# Altium PCB Power.PcbDoc
Units mm, origin at the board's own origin, x right, y up, seen from the top; angles counter-clockwise.
Board outline 73.81 x 101.75 mm, 2 copper layers (Top Layer, Bottom Layer), stack 1.448 mm thick; 31 components, 35 nets, 115 pads, 27 vias.
Unrouted connection lines stored in the file: 13.
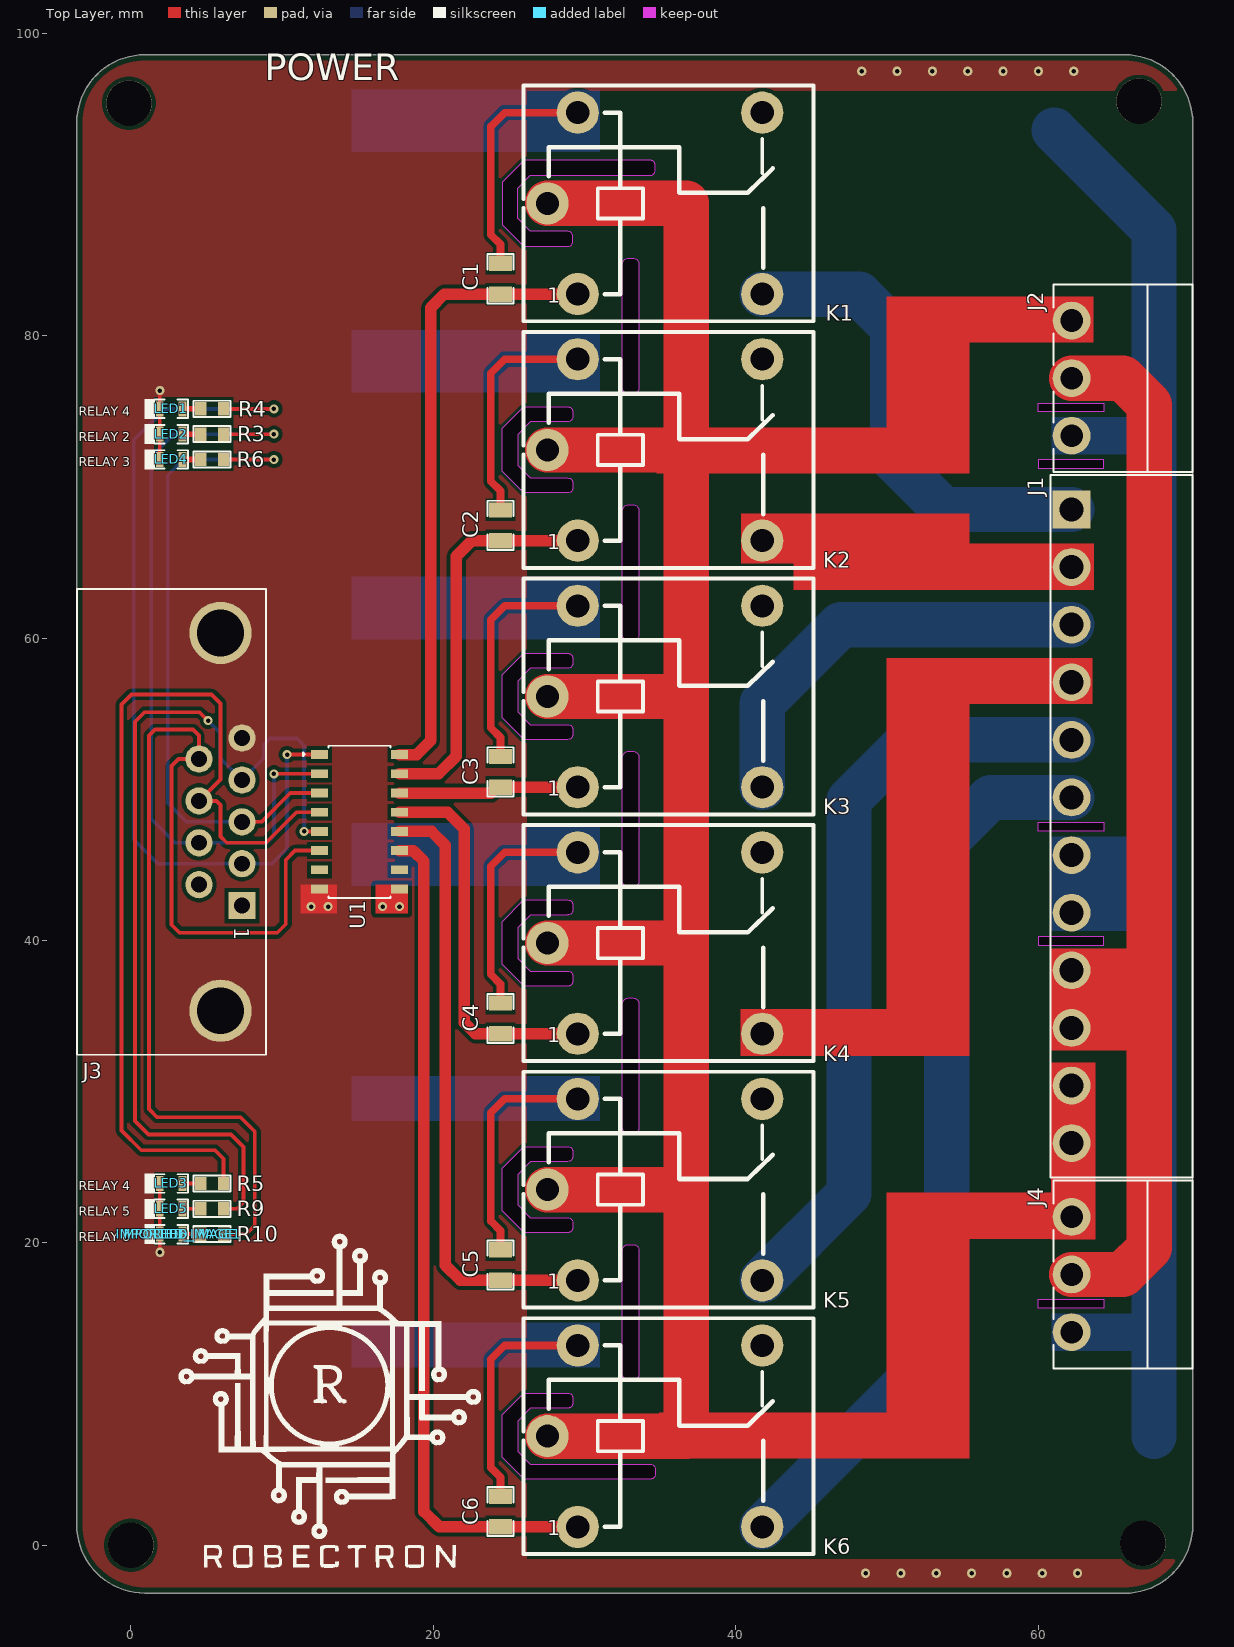
[diagram p0: Top Layer view]
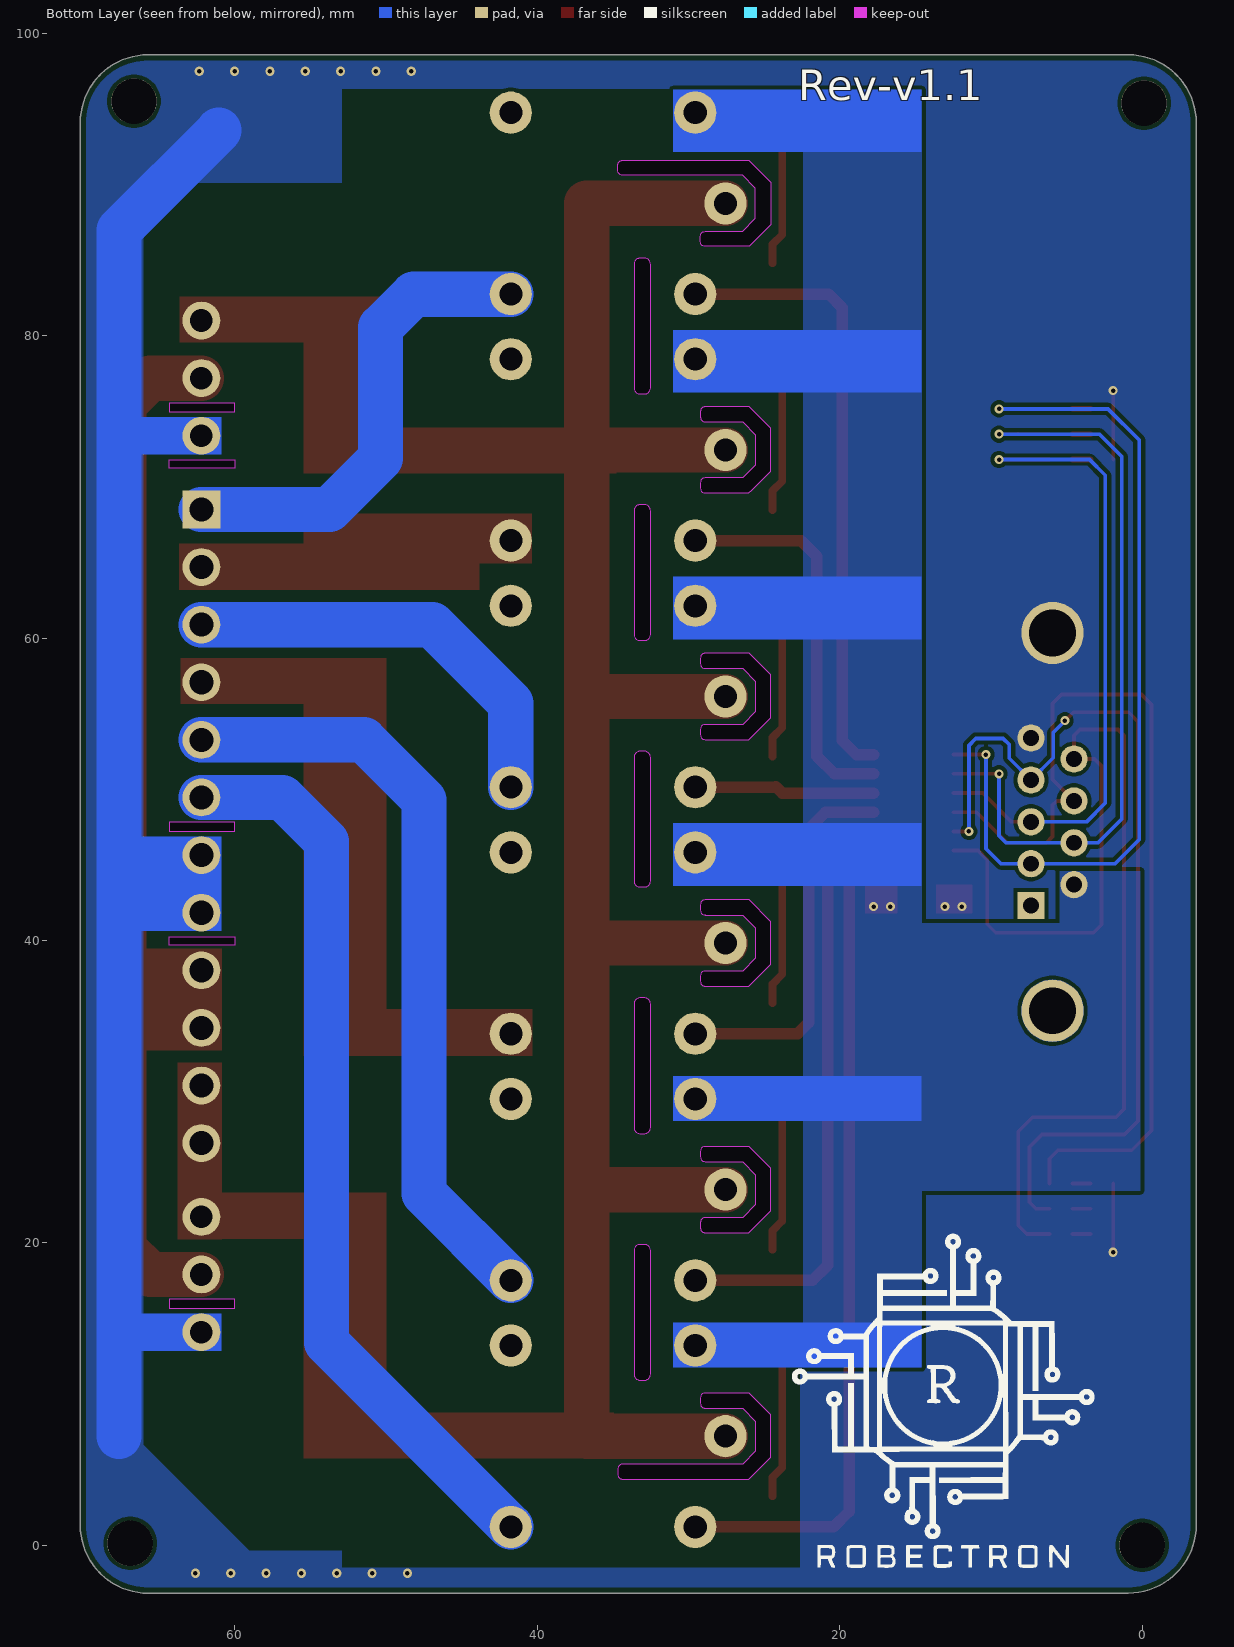
[diagram p1: Bottom Layer view, seen from below]
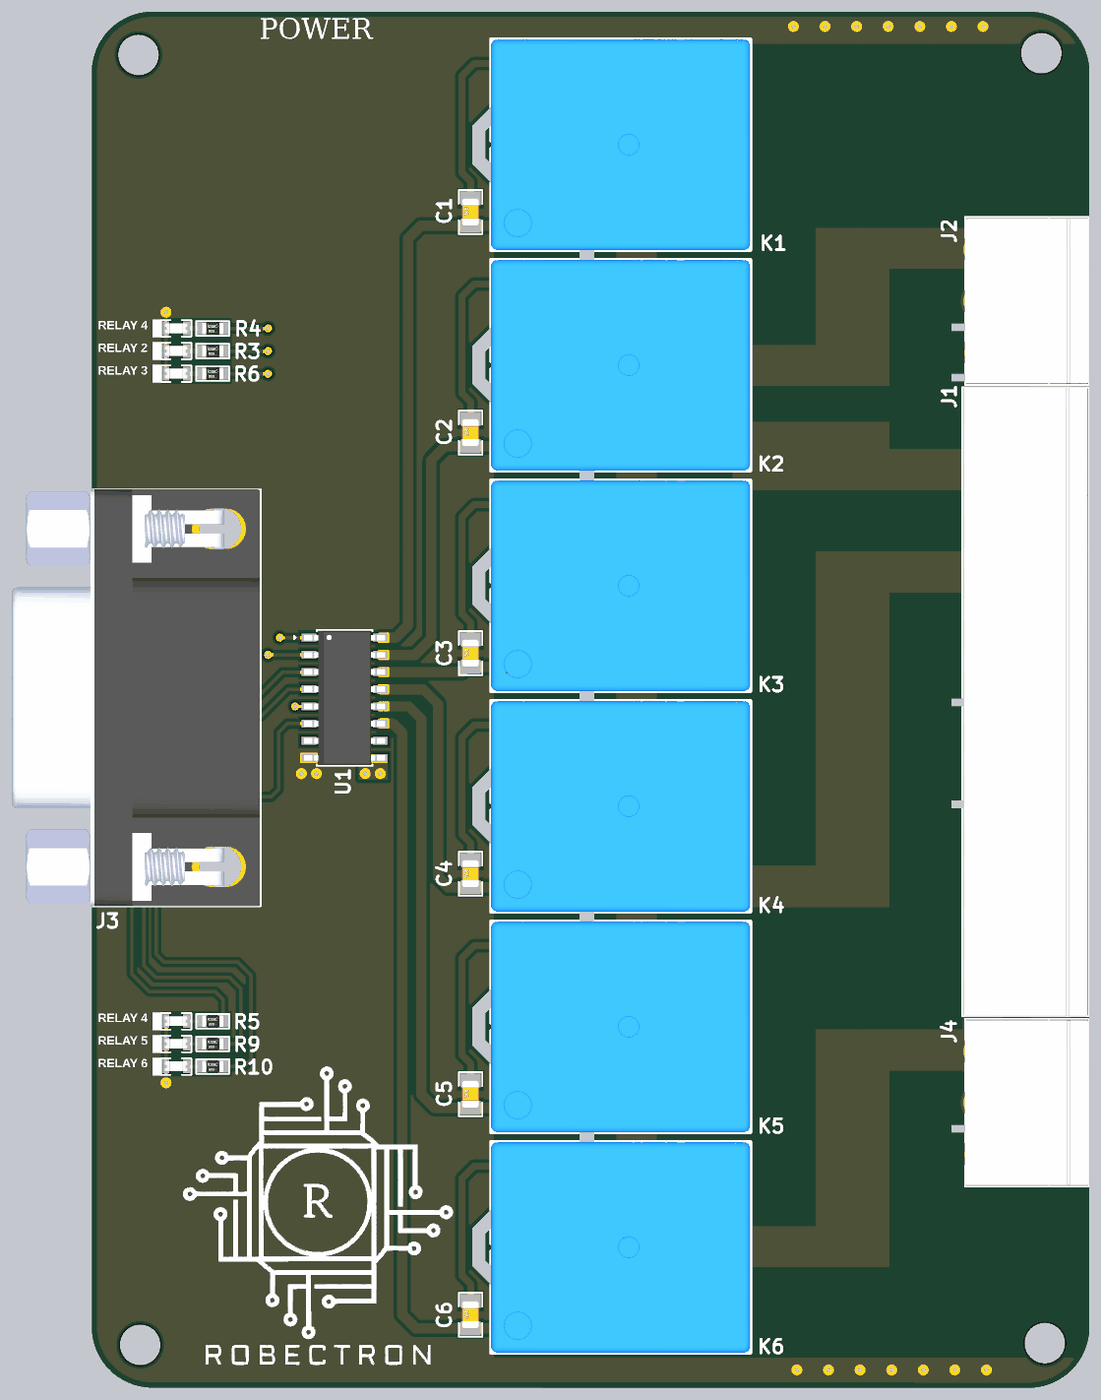
[diagram p2: 3D render of the assembled board from above, using the file's embedded part models]

## Layer stack, top to bottom
Top Solder: solder mask 0.0762, Solder Resist, Dk 3.5
Top Layer: signal copper 0.254
Dielectric 1: core 0.9398, FR-4, Dk 4.8
Bottom Layer: signal copper 0.254
Bottom Solder: solder mask 0.0762, Solder Resist, Dk 3.5

## Board outline
-3.581,1.34 -3.581,94.077 cw(c0.919,94.077) 0.919,98.577 65.731,98.577 cw(c65.731,94.077) 70.231,94.077 70.231,1.325 cw(c65.731,1.325) 65.731,-3.174 0.919,-3.16 cw(c0.919,1.34)
cut-out: 26.01,91.592 25.832,91.415 24.562,90.145 24.562,87.325 25.989,85.898 28.905,85.898 ccw(c28.905,86.203) 29.21,86.203 29.21,86.584 ccw(c28.905,86.584) 28.905,86.889 28.905,86.893 26.427,86.893 25.571,87.749 25.571,89.746 26.427,90.602 34.366,90.602 ccw(c34.366,90.907) 34.671,90.907 34.671,91.288 ccw(c34.366,91.288) 34.366,91.592
cut-out: 26.01,4.369 25.832,4.547 24.562,5.817 24.562,8.636 25.989,10.063 28.905,10.063 cw(c28.905,9.758) 29.21,9.758 29.21,9.377 cw(c28.905,9.377) 28.905,9.072 28.905,9.068 26.427,9.068 25.571,8.212 25.571,6.215 26.427,5.359 34.366,5.359 cw(c34.366,5.055) 34.671,5.055 34.671,4.674 cw(c34.366,4.674) 34.366,4.369
cut-out: 26.01,20.676 25.832,20.853 24.562,22.123 24.562,24.943 25.989,26.37 28.905,26.37 cw(c28.905,26.065) 29.21,26.065 29.21,25.684 cw(c28.905,25.684) 28.905,25.379 28.905,25.375 26.427,25.375 25.571,24.519 25.571,22.522 26.427,21.666 28.905,21.666 cw(c28.905,21.361) 29.21,21.361 29.21,20.98 cw(c28.905,20.98) 28.905,20.676
cut-out: 26.01,36.982 25.832,37.16 24.562,38.43 24.562,41.25 25.989,42.677 28.905,42.677 cw(c28.905,42.372) 29.21,42.372 29.21,41.991 cw(c28.905,41.991) 28.905,41.686 28.905,41.681 26.427,41.681 25.571,40.826 25.571,38.829 26.427,37.973 28.905,37.973 cw(c28.905,37.668) 29.21,37.668 29.21,37.287 cw(c28.905,37.287) 28.905,36.982
cut-out: 26.01,53.289 25.832,53.467 24.562,54.737 24.562,57.556 25.989,58.983 28.905,58.983 cw(c28.905,58.679) 29.21,58.679 29.21,58.298 cw(c28.905,58.298) 28.905,57.993 28.905,57.988 26.427,57.988 25.571,57.133 25.571,55.135 26.427,54.28 28.905,54.28 cw(c28.905,53.975) 29.21,53.975 29.21,53.594 cw(c28.905,53.594) 28.905,53.289
cut-out: 26.01,69.596 25.832,69.774 24.562,71.044 24.562,73.863 25.989,75.29 28.905,75.29 cw(c28.905,74.985) 29.21,74.985 29.21,74.604 cw(c28.905,74.604) 28.905,74.3 28.905,74.295 26.427,74.295 25.571,73.439 25.571,71.442 26.427,70.587 28.905,70.587 cw(c28.905,70.282) 29.21,70.282 29.21,69.901 cw(c28.905,69.901) 28.905,69.596
cut-out: 32.512,11.303 32.512,19.507 cw(c32.893,19.507) 32.893,19.888 33.223,19.888 cw(c33.223,19.507) 33.604,19.507 33.604,11.303 cw(c33.223,11.303) 33.223,10.922 32.893,10.922 cw(c32.893,11.303)
cut-out: 32.512,27.61 32.512,35.814 cw(c32.893,35.814) 32.893,36.195 33.223,36.195 cw(c33.223,35.814) 33.604,35.814 33.604,27.61 cw(c33.223,27.61) 33.223,27.229 32.893,27.229 cw(c32.893,27.61)
cut-out: 32.512,43.917 32.512,52.121 cw(c32.893,52.121) 32.893,52.502 33.223,52.502 cw(c33.223,52.121) 33.604,52.121 33.604,43.917 cw(c33.223,43.917) 33.223,43.536 32.893,43.536 cw(c32.893,43.917)
cut-out: 32.512,60.223 32.512,68.428 cw(c32.893,68.428) 32.893,68.809 33.223,68.809 cw(c33.223,68.428) 33.604,68.428 33.604,60.223 cw(c33.223,60.223) 33.223,59.842 32.893,59.842 cw(c32.893,60.223)
cut-out: 32.512,76.53 32.512,84.734 cw(c32.893,84.734) 32.893,85.115 33.223,85.115 cw(c33.223,84.734) 33.604,84.734 33.604,76.53 cw(c33.223,76.53) 33.223,76.149 32.893,76.149 cw(c32.893,76.53)
cut-out: 60.021,16.258 64.339,16.258 64.339,15.674 60.021,15.674
cut-out: 60.021,71.22 64.339,71.22 64.339,71.804 60.021,71.804
cut-out: 60.021,75.541 64.339,75.541 64.339,74.957 60.021,74.957
cut-out: 60.02,47.806 64.338,47.806 64.338,47.222 60.02,47.222
cut-out: 60.02,39.675 64.338,39.675 64.338,40.259 60.02,40.259

## Design rules (kind name [scope] priority, off if disabled: settings)
BoardOutlineClearance [All] p1: gap=0 ignorepadtopadclearanceinfootprint=FALSE except(0.381: Poly-OutlineEdge)
Clearance [All] p1: gap=0.254 ignorepadtopadclearanceinfootprint=FALSE except(0: Arc-Hole Track-Hole SMDPad-Hole THPad-Hole Via-Hole Fill-Hole Poly-Hole Region-Hole Text-Hole; 0.127: Track-Region Fill-Region)
HoleSize [All] p1: absolutevalues=TRUE maxlimit=3.2 minlimit=0.025 maxpercent=80.000 minpercent=20.000
MinimumSolderMaskSliver [All] p1: minsoldermaskwidth=0
PolygonConnect [All] p1: connectstyle=Direct reliefconductorwidth=0.381 reliefentries=4 polygonreliefangle="45 Angle" airgapwidth=0.254
RoutingVias [All] p1: holewidth=0.3 width=0.6 viastyle="Through Hole" minholewidth=0.3 minwidth=0.6 maxholewidth=0.3 maxwidth=0.6
SilkToSilkClearance [All] p1: silktosilkclearance=0
SilkToSolderMaskClearance [IsPad] p1: minsilkscreentomaskgap=0 clearancetoexposedcopper=TRUE
SolderMaskExpansion [All] p1: expansion=0.102 istentingtop=FALSE
UnRoutedNet [All] p1: checkbadconnections=TRUE
Width [All] p1: maxlimit=3 minlimit=0.254 preferedwidth=0.305 minimp=50.000000 maximp=50.000000 favimp=50.000000
25 further rules are at their usual default settings.

## Classes and differential pairs
component class Power-Sheet-v1.1: C1 C2 C3 C4 C5 C6 J1 J2 J3 J4 K1 K2 K3 K4 K5 K6 LED1 LED2 LED3 LED4 LED5 LED6 R3 R4 R5 R6 R9 R10 U1

## Components (designator, comment, footprint, x,y, rotation, side; value= is the part's Value field where it differs from the comment)
C1 "10uF" Cap-0805 24.446,83.764 r90 top locked
C2 "10uF" Cap-0805 24.446,67.457 r90 top locked
C3 "10uF" Cap-0805 24.446,51.15 r90 top locked
C4 "10uF" Cap-0805 24.446,34.843 r90 top locked
C5 "10uF" Cap-0805 24.446,18.536 r90 top locked
C6 "10uF" Cap-0805 24.446,2.23 r90 top locked
IMPORTED_IMAGE "Comment" IMPORTED_IMAGE 3.162,20.579 r0 top
IMPORTED_IMAGE1 "Comment" IMPORTED_IMAGE 3.162,20.579 r0 top (schematic designator IMPORTED_IMAGE)
J1 "DB2ERC-3.81-12P-GN" DB2ERC-3.81-12P-GN 62.216,47.551 r90 top locked
J2 "DB2ERC-3.81-3P-GN" DB2ERC-3.81-3P-GN 62.217,77.191 r90 top locked
J3 "A-DF 09 A/KG-T2S" "A-DF 09 A/KG-T2S" 5.927,47.845 r270 top
J4 "DB2ERC-3.81-3P-GN" DB2ERC-3.81-3P-GN 62.217,17.907 r90 top locked
K1 "SRD-05VDC-SL-C" SRD-05VDC-SL-C 34.655,88.748 r0 top
K2 "SRD-05VDC-SL-C" SRD-05VDC-SL-C 34.655,72.441 r0 top
K3 "SRD-05VDC-SL-C" SRD-05VDC-SL-C 34.655,56.134 r0 top
K4 "SRD-05VDC-SL-C" SRD-05VDC-SL-C 34.655,39.827 r0 top
K5 "SRD-05VDC-SL-C" SRD-05VDC-SL-C 34.655,23.52 r0 top
K6 "SRD-05VDC-SL-C" SRD-05VDC-SL-C 34.655,7.214 r0 top
LED1 "LTST-C193KRKT-5A" LED-0603 2.662,75.159 r180 top locked
LED2 "LTST-C193KRKT-5A" LED-0603 2.662,73.485 r180 top locked
LED3 "LTST-C193KRKT-5A" LED-0603 2.662,23.925 r180 top locked
LED4 "LTST-C193KRKT-5A" LED-0603 2.662,71.812 r180 top locked
LED5 "LTST-C193KRKT-5A" LED-0603 2.662,22.252 r180 top locked
LED6 "LTST-C193KRKT-5A" LED-0603 2.662,20.579 r180 top locked
R3 "220R" Res-0603 5.368,73.485 r0 top locked
R4 "220R" Res-0603 5.368,75.159 r0 top locked
R5 "220R" Res-0603 5.368,23.925 r0 top locked
R6 "220R" Res-0603 5.368,71.812 r0 top locked
R9 "220R" Res-0603 5.368,22.252 r0 top locked
R10 "220R" Res-0603 5.368,20.579 r0 top locked
U1 "ULN2003AIDR" "16-SOIC (0.154\", 3.90mm Width)" 15.124,47.845 r0 top locked

## Footprints (in the part's own frame and the unit in brackets; to place one, negate y for a bottom-side part, rotate by r counter-clockwise, add the part's x,y. Pads: shape width x height; smd on the part's side, far side on the other; paste and mask are expansions set on the pad)
"16-SOIC (0.154\", 3.90mm Width)" [mm]
  rect 1.12x0.58 smd: 1(-2.64,4.445) 2(-2.64,3.175) 3(-2.64,1.905) 4(-2.64,0.635) 5(-2.64,-0.635) 6(-2.64,-1.905) 7(-2.64,-3.175) 8(-2.64,-4.445) 9(2.64,-4.445) 10(2.64,-3.175) 11(2.64,-1.905) 12(2.64,-0.635) 13(2.64,0.635) 14(2.64,1.905) 15(2.64,3.175) 16(2.64,4.445)
  silkscreen extent -3.74,-5.03 2.06,5.03, body extent -3,-4.95 3,4.95, height 1.75
"A-DF 09 A/KG-T2S" [mm]
  rect 1.8x1.8 / inner round 1.8 / far side rect 1.8x1.8 hole 1.05: 1(5.54,1.42)
  round 1.8 hole 1.05: 2(2.77,1.42) 3(0,1.42) 4(-2.77,1.42) 5(-5.54,1.42) 6(4.155,-1.42) 7(1.385,-1.42) 8(-1.385,-1.42) 9(-4.155,-1.42)
  round 4.116 hole 3.1: S1(-12.495,0) S2(12.495,0)
  silkscreen extent -15.41,-9.5 15.41,3, body extent -15.41,-15.4 15.41,2.9, height 12.8
Cap-0805 [mil] "SMD 0805"
  rect 40x60 smd mask+2.76: 1(-40,0) 2(40,0)
  silkscreen extent -64,-34 64,34, body extent -39,-25 39,25, height 30
DB2ERC-3.81-3P-GN [mm]
  round 2.5 hole 1.5 paste+0 mask+0.051: 1(-3.81,0) 2(0,0) 3(3.81,0)
  silkscreen extent -6.21,-8 6.21,1.2, body extent -6.11,-7.97 6.11,1.23, height 7.2
DB2ERC-3.81-12P-GN [mm]
  rect 2.5x2.5 hole 1.6 paste+0 mask+0.051: 1(20.955,0)
  round 2.5 hole 1.6 paste+0 mask+0.051: 2(17.145,0) 3(13.335,0) 4(9.525,0) 5(5.715,0) 6(1.905,0) 7(-1.905,0) 8(-5.715,0) 9(-9.525,0) 10(-13.335,0) 11(-17.145,0) 12(-20.955,0)
  silkscreen extent -23.24,-8 23.24,1.4, body extent -23.26,-7.9 23.26,1.3, height 7.2
IMPORTED_IMAGE [mm]
  silkscreen extent 0,-22.05 19.99,0.01
LED-0603 [mm]
  rect 0.5x1 smd: 1(-0.75,0) 2(0.75,0)
  silkscreen extent -1.12,-0.66 1.75,0.66, body extent -0.82,-0.37 0.82,0.36, height 0.68
Res-0603 [mil]
  rect 30x35 smd: 1(-30,0) 2(30,0)
  silkscreen extent -48,-21 48,21, body extent -31,-17 31,17, height 18
SRD-05VDC-SL-C [mil]
  round 110 hole 60 paste+0 mask+2: 1(-200.79,-236.22) 2(279.52,-236.2) 3(279.53,236.2) 4(-200.79,236.22) 5(-279.53,0)
  silkscreen extent -342,-307 413,307, body extent -343,-307 413,307, height 642

## Part data
C1 C2 C3 C4 C5 C6: library part GRM21BR61H106ME43L, "CAP CER 10UF 50V X5R 0805", LCSC Part Number=C2190942, Manufacturer=Murata, Supplier Part Number 1=490-18664-1-ND, Category="Ceramic Capacitors", Manufacturer Part Number=GRM21BR61H106ME43L, Pricing 1="1=0.44000, 10=0.30700, 50=0.21500, 100=0.18420, 500=0.13818, 1000=0.11668 (USD)", RoHS=Yes, Stock 1=26, Supplier 1=Digi-Key
J1: "250V 10A 12 Bend -40℃~+105℃ 1 3.81mm 1x12P Green Board Edge/Receptacle-Close Push-Pull,P=3.81mm Pluggable System Terminal Block ROHS", LCSC Part Number=C395728, Manufacturer=DORABO, Package=Push-Pull,P=3.81mm, ComponentLink1Description=LCSC, ComponentLink1URL=https://www.lcsc.com/product-detail/Pluggable-System-Terminal-Block_DORABO-DB2ERC-3-81-12P-GN_C395728.html, Item Type="Terminal Block", Manufacturer Part Number=DB2ERC-3.81-12P-GN
J2 J4: "250V 10A 3 Bend -40℃~+105℃ 1 3.81mm 1x3P Green Board Edge/Receptacle-Close Push-Pull,P=3.81mm Pluggable System Terminal Block ROHS", LCSC Part Number=C395690, Manufacturer=DORABO, Package=Push-Pull,P=3.81mm, ComponentLink1Description=LCSC, ComponentLink1URL=https://www.lcsc.com/product-detail/Pluggable-System-Terminal-Block_DORABO-DB2ERC-3-81-3P-GN_C395690.html, Item Type="Terminal Block", Manufacturer Part Number=DB2ERC-3.81-3P-GN
J3: "CONN D-SUB RCPT 9POS R/A SLDR", Manufacturer=Assmann, Supplier Part Number=AE10921-ND, ComponentLink1Description=https://datasheet.ciiva.com/26927/getdatasheetpartid-755627-26927441.pdf?src-supplier=Verical, ComponentLink1URL=https://datasheet.ciiva.com/26927/getdatasheetpartid-755627-26927441.pdf?src-supplier=Verical, Height=12.68mm, Item Type="D-Sub Connectors", Lead Free=5697LeadFree, Manufacturer Part Number="A-DF 09 A/KG-T2S", Number of Contacts=9NUMBER, Pricing="1=0.78, 10=0.661, 25=0.6336, 40=0.62025, 90=0.59322, 270=0.53933, 450=0.4854, 990=0.43147, 2430=0.39102 (USD)", RoHS=Yes, Stock=23990, Supplier=Digikey
K1 K2 K3 K4 K5 K6: "250V@AC 5V 15A SPDT (1 Form C) Plugin,15.6x19.2mm Power Relays ROHS", LCSC Part Number=C35449, Manufacturer="Ningbo Songle Relay", Package=Plugin,15.6x19.2mm, ComponentLink1Description=LCSC, ComponentLink1URL=https://www.lcsc.com/product-detail/Power-Relays_Ningbo-Songle-Relay-SRD-05VDC-SL-C_C35449.html, Item Type=Relays, Manufacturer Part Number=SRD-05VDC-SL-C
LED1 LED2 LED3 LED4 LED5 LED6: "LED RED CLEAR CHIP SMD", Case Code (Imperial)=0603, Case Code (Metric)=1608, Color=Red, Forward Current=30mA, Forward Voltage=2.3V, Lens Color=Colorless, Manufacturer="Vishay Lite-On", Max Operating Temperature=85°C, Min Operating Temperature=-55°C, Package Quantity=3000, Power Dissipation=75mW, Reverse Voltage=5V, Supplier Part Number=160-1830-1-ND, Test Current=5mA, Case/Package=0603, ComponentLink1Description=https://datasheet.ciiva.com/11775/0900766b80dc0551-11775612.pdf?src-supplier=Rs, ComponentLink1URL=https://datasheet.ciiva.com/11775/0900766b80dc0551-11775612.pdf?src-supplier=Rs, ComponentLink2Description=https://datasheet.ciiva.com/4689/100-ltst-c193krkt-5a-61179-4689123.pdf?src-supplier=Mouser, ComponentLink2URL=https://datasheet.ciiva.com/4689/100-ltst-c193krkt-5a-61179-4689123.pdf?src-supplier=Mouser, ComponentLink3Description=https://datasheet.ciiva.com/16210/ltst-c193krkt-5a-16210822.pdf?src-supplier=Future+Electronics, ComponentLink3URL=https://datasheet.ciiva.com/16210/ltst-c193krkt-5a-16210822.pdf?src-supplier=Future+Electronics, ComponentLink4Description=https://datasheet.ciiva.com/2110/s-110-ltst-c193krkt-5a-2110272.pdf?src-supplier=Digikey, ComponentLink4URL=https://datasheet.ciiva.com/2110/s-110-ltst-c193krkt-5a-2110272.pdf?src-supplier=Digikey, Depth=0.8mm, Dominant Wavelength=631nm, Height=0.45mm, Illumination Color=Red, Item Type=LEDs, Lead Free="Lead Free", Length=1.6mm, Lens Size=0.8mm, Lens Style=Flat,Diffused,Colorless,Rectangular,Clear, Lens Transparency=Clear, Luminous Intensity=45mcd, Manufacturer Part Number=LTST-C193KRKT-5A, Mounting Technology="Surface Mount", Number of Elements=1, Number of LEDs=1, Packaging="Tape and Reel", Pins=2, Pricing="1=0.39, 10=0.211, 100=0.0981, 500=0.0906, 1000=0.07097, 2000=0.06946 (USD)", Radiation Hardening=No, RoHS=Yes, RoHS Compliant=Yes, Series=-, Stock=241564, Supplier=Digikey, Viewing Angle=130°, Wavelength=631nm, Width=0.8mm
R3 R4 R5 R6 R9 R10: library part CRCW0603220RFKEA, "RES SMD 220 OHM 1% 1/10W 0603", Case Code (Imperial)=0603, Case Code (Metric)=1608, LCSC Part Number=C844757, Max Operating Temperature=155°C, Max Power Dissipation=100mW, Min Operating Temperature=-55°C, Package Quantity=5000, Ratings=AEC-Q200, Resistance Tolerance=1%, Resistor Type="Thick Film", Supplier Part Number=71-CRCW0603-220-E3, Temperature Coefficient=100ppm/°C, Voltage Rating=75V, Case/Package=0603, Category="Chip SMD Resistors", ComponentLink1Description=LCSC, ComponentLink2Description=https://datasheet.ciiva.com/11810/0900766b80d98afc-11810631.pdf?src-supplier=Rs, ComponentLink2URL=https://datasheet.ciiva.com/11810/0900766b80d98afc-11810631.pdf?src-supplier=Rs, ComponentLink3Description=https://datasheet.ciiva.com/8339/dcrcwe3-8339957.pdf?src-supplier=Avnet, ComponentLink3URL=https://datasheet.ciiva.com/8339/dcrcwe3-8339957.pdf?src-supplier=Avnet, ComponentLink4Description=https://datasheet.ciiva.com/16222/dcrcwe3-16222278.pdf?src-supplier=Future+Electronics, ComponentLink4URL=https://datasheet.ciiva.com/16222/dcrcwe3-16222278.pdf?src-supplier=Future+Electronics, ComponentLink5Description=https://datasheet.ciiva.com/7777/1697337-7777301.pdf?src-supplier=Element14, ComponentLink5URL=https://datasheet.ciiva.com/7777/1697337-7777301.pdf?src-supplier=Element14, ComponentLink6Description=https://datasheet.ciiva.com/16763/70201119-16763287.pdf?src-supplier=Allied+Electronics, ComponentLink6URL=https://datasheet.ciiva.com/16763/70201119-16763287.pdf?src-supplier=Allied+Electronics, ComponentLink7Description=https://datasheet.ciiva.com/2466/dcrcwe3-2466464.pdf?src-supplier=Digi-Key, ComponentLink7URL=https://datasheet.ciiva.com/2466/dcrcwe3-2466464.pdf?src-supplier=Digi-Key, ComponentLink8Description=https://datasheet.ciiva.com/2466/dcrcwe3-2466465.pdf?src-supplier=Digi-Key, ComponentLink8URL=https://datasheet.ciiva.com/2466/dcrcwe3-2466465.pdf?src-supplier=Digi-Key, ComponentLink9Description=https://datasheet.ciiva.com/2466/dcrcwe3-2466466.pdf?src-supplier=Digi-Key, ComponentLink9URL=https://datasheet.ciiva.com/2466/dcrcwe3-2466466.pdf?src-supplier=Digi-Key, ComponentLink10Description=https://datasheet.ciiva.com/7777/1720486-7777551.pdf?src-supplier=Element14, ComponentLink10URL=https://datasheet.ciiva.com/7777/1720486-7777551.pdf?src-supplier=Element14, ComponentLink11Description=https://datasheet.ciiva.com/26316/fld-crcw-e3-data-en-26316574.pdf?src-supplier=Distrelec, ComponentLink11URL=https://datasheet.ciiva.com/26316/fld-crcw-e3-data-en-26316574.pdf?src-supplier=Distrelec, ComponentLink12Description=https://datasheet.ciiva.com/5550/dcrcwe3-109170-5550773.pdf?src-supplier=Mouser, ComponentLink12URL=https://datasheet.ciiva.com/5550/dcrcwe3-109170-5550773.pdf?src-supplier=Mouser, ComponentLink13Description=https://datasheet.ciiva.com/15159/getdatasheetpartid-45816-15159565.pdf?src-supplier=Verical, ComponentLink13URL=https://datasheet.ciiva.com/15159/getdatasheetpartid-45816-15159565.pdf?src-supplier=Verical, Construction=Rectangular, Contact Plating=Tin, Depth=0.85mm, Features="Automotive AEC-Q200", Height=0.45mm, Item Type=Resistor, Lead Free="Lead Free", Length=1.55mm, Military Standard=Not, Number of Terminations=2, Packaging="Tape and Reel", Power Rating=100mW, Pricing="1=0.1, 10=0.017, 50=0.017, 100=0.01, 1000=0.008, 10000=0.004 (USD)", Radiation Hardening=No, Reach SVHC Compliant=Unknown, RoHS=Yes, RoHS Compliant=Yes, Series=CRCW, Stock=40706, Supplier=Mouser, Technology="THICK FILM", Termination=SMD/SMT, Tolerance=1%, Voltage Rating (DC)=75V, Weight=7.1E-05oz, Width=0.85mm
U1: "IC PWR RELAY 7NPN 1:1 16SOIC", Manufacturer="Texas Instruments", Supplier Part Number=595-ULN2003AIDR, ComponentLink1Description=https://datasheet.ciiva.com/15139/getdatasheetpartid-47948-15139878.pdf?src-supplier=Verical, ComponentLink1URL=https://datasheet.ciiva.com/15139/getdatasheetpartid-47948-15139878.pdf?src-supplier=Verical, ComponentLink2Description=https://datasheet.ciiva.com/14424/ulq2003a-14424030.pdf?src-supplier=Avnet, ComponentLink2URL=https://datasheet.ciiva.com/14424/ulq2003a-14424030.pdf?src-supplier=Avnet, ComponentLink3Description=https://datasheet.ciiva.com/1700/uln2003ai-1700820.pdf?src-supplier=Digikey, ComponentLink3URL=https://datasheet.ciiva.com/1700/uln2003ai-1700820.pdf?src-supplier=Digikey, ComponentLink4Description=https://datasheet.ciiva.com/1700/uln2003ai-1700821.pdf?src-supplier=Digikey, ComponentLink4URL=https://datasheet.ciiva.com/1700/uln2003ai-1700821.pdf?src-supplier=Digikey, ComponentLink5Description=https://datasheet.ciiva.com/1700/uln2003ai-1700822.pdf?src-supplier=Digikey, ComponentLink5URL=https://datasheet.ciiva.com/1700/uln2003ai-1700822.pdf?src-supplier=Digikey, Item Type=IC, Manufacturer Part Number=ULN2003AIDR, Pricing="1=0.66, 10=0.589, 50=0.589, 100=0.402, 1000=0.285, 10000=0.232 (USD)", RoHS=Yes, Stock=2012, Supplier=Mouser

## Free pads (board coordinates)
  round 3 hole 3 unplated paste+0: ""(-0.127,95.377) ""(0,0) ""(66.675,95.504) ""(66.929,0.127)

## Via types
v1: diameter 0.6, hole 0.3, Top Layer to Bottom Layer, 27 vias

## Nets (pads, with @x,y where several pads share a name; then routed paths per layer and width w, separated by ;. In a path a pad name is that pad's centre, name@x,y a point inside that pad or via, vN(x,y) a via of type N, cw(c..) or ccw(c..) an arc to the next point about the centre after c; other vN are vias at no path point)
5V_EXT: C1.2 C2.2 C3.2 C4.2 C5.2 C6.2 J3.6 K1.4 K2.4 K3.4 K4.4 K5.4 K6.4 U1.9 | length 92.7
  Top Layer w0.508: C6.2 24.446,4.501 23.806,5.141 23.806,12.293 24.726,13.214 K6.4 ; C5.2 24.446,20.808 23.806,21.448 23.806,28.6 24.726,29.52 K5.4 ; C4.2 24.446,37.115 23.806,37.754 23.806,44.907 24.726,45.827 K4.4 ; C3.2 24.446,53.421 23.806,54.061 23.806,61.214 24.726,62.134 K3.4 ; C2.2 24.446,69.728 23.806,70.368 23.806,77.521 24.726,78.441 K2.4 ; C1.2 24.446,86.035 23.806,86.675 23.806,93.827 24.726,94.748 K1.4
  other v1: 16.644,42.24 17.764,42.24
AC+: J1.11 J1.12 J2.3 J4.3 K1.5 K2.5 K3.5 K4.5 K5.5 K6.5 | length 136.6
  Top Layer w3: K6.5 36.728,7.214 36.728,23.52 ; K5.5 36.728,23.52 ; K4.5 36.728,39.827 ; K3.5 36.728,56.134 ; K2.5 36.728,72.441 ; K1.5 36.728,88.748 36.728,72.441 ; 36.728,23.52 36.728,39.827 ; 36.728,39.827 36.728,56.134 ; 36.728,56.134 36.728,72.441
AC-: J1.9 J1.10 J2.2 J4.2 | length 70.2
  Top Layer w3: J4.2 65.603,17.907 67.361,19.664 67.361,36.114 ; J2.2 65.603,77.191 67.361,75.433 67.361,36.114 ; 65.463,34.216 67.361,36.114
GND: J1.7 J1.8 J2.1 J3.5 J3.S1 J3.S2 J4.1 LED1.2 LED2.2 LED3.2 LED4.2 LED5.2 LED6.2 U1.8 | length 98.2
  Top Layer w0.254: v1@1.912,19.38 LED6.2 LED5.2 LED3.2 ; LED4.2 LED2.2 LED1.2 v1(1.912,76.358)
  Bottom Layer w3: 61.062,93.574 67.666,86.97 67.666,73.381 67.666,43.755 67.666,13.977 67.666,7.218
  other v1: 48.59,-1.854 50.927,-1.854 53.264,-1.854 55.601,-1.854 57.937,-1.854 60.274,-1.854 62.611,-1.854 1.912,19.379 11.924,42.24 13.044,42.24 48.336,97.485 50.673,97.485 53.01,97.485 55.347,97.485 57.683,97.485 60.02,97.485 62.357,97.485
IN1: J3.2 R4.2 U1.1 | length 59.5
  Top Layer w0.254: R4.2 v1(9.46,75.159) ; v1(10.332,52.293) 10.333,52.291 12.483,52.291 U1.1
  Bottom Layer w0.254: v1(9.46,75.159) 2.251,75.159 0.19,73.098 0.19,46.672 1.787,45.075 J3.2 9.341,45.075 10.332,46.066 v1(10.332,52.293)
IN2: J3.7 R3.2 U1.2 | length 52.1
  Top Layer w0.254: R3.2@6.134,73.481 8.217,73.481 ; 8.213,73.485 8.217,73.481 ; v1(9.46,51.02) U1.2 ; v1(9.46,73.481) 8.217,73.481
  Bottom Layer w0.254: v1(9.46,51.02) 9.46,46.926 8.994,46.46 J3.7 2.919,46.46 1.344,48.035 1.344,72.009 2.816,73.481 v1(9.46,73.481)
IN3: J3.3 R6.2 U1.3 | length 43.8
  Top Layer w0.254: R6.2@6.138,71.804 8.22,71.804 ; J3.3 8.636,47.845 10.541,49.75 U1.3 ; 8.213,71.812 8.22,71.804 ; v1(9.46,71.804) 8.22,71.804
  Bottom Layer w0.254: J3.3 3.689,47.845 2.438,49.096 2.438,70.764 3.479,71.804 v1(9.46,71.804)
IN4: J3.8 R5.2 U1.4 | length 62.6
  Top Layer w0.254: R5.2 6.13,25.562 5.568,26.124 0.685,26.124 -0.617,27.425 -0.617,55.603 0.045,56.265 5.325,56.265 5.927,55.664 5.927,50.65 J3.8 5.649,49.23 5.929,48.951 5.929,46.877 6.342,46.464 8.93,46.464 10.946,48.48 U1.4
IN5: J3.4 R9.2 U1.5 | length 62.3
  Top Layer w0.254: v1(5.105,54.534) 4.547,55.093 0.889,55.093 0.262,54.466 0.262,28.057 1.157,27.162 6.624,27.162 7.445,26.341 7.445,22.687 7.01,22.252 R9.2 ; v1@11.458,47.21 U1.5
  Bottom Layer w0.254: v1(5.105,54.534) 5.875,53.764 5.875,52.087 J3.4 8.785,52.053 8.785,52.955 9.191,53.362 11,53.362 11.458,52.905 v1(11.458,47.209)
IN6: J3.9 R10.2 U1.6 | length 73.3
  Top Layer w0.254: R10.2 7.629,20.579 8.195,21.145 8.195,27.356 7.243,28.307 1.73,28.307 1.196,28.841 1.196,53.543 1.605,53.952 4.106,53.952 4.507,53.551 J3.9 3.155,52 2.688,51.534 2.688,41.034 3.209,40.513 9.684,40.513 10.242,41.071 10.242,45.323 10.859,45.94 U1.6
NC1: K1.3
NC2: K2.3
NC3: K3.3
NC4: K4.3
NC5: K5.3
NC6: K6.3
NetLED1_1: LED1.1 R4.1 | length 1.2
  Top Layer w0.381: LED1.1 R4.1
NetLED2_1: LED2.1 R3.1 | length 1.2
  Top Layer w0.381: LED2.1 R3.1
NetLED3_1: LED3.1 R5.1 | length 1.2
  Top Layer w0.254: LED3.1 R5.1
NetLED4_1: LED4.1 R6.1 | length 1.2
  Top Layer w0.381: LED4.1 R6.1
NetLED5_1: LED5.1 R9.1 | length 1.2
  Top Layer w0.254: LED5.1 R9.1
NetLED6_1: LED6.1 R10.1 | length 1.2
  Top Layer w0.254: LED6.1 R10.1
NO1: J1.1 K1.2 | length 31.4
  Bottom Layer w3: K1.2 48.164,82.748 50.368,80.543 50.368,71.882 53.745,68.506 J1.1
NO2: J1.2 K2.2
NO3: J1.3 K3.2 | length 28.2
  Bottom Layer w3: K3.2 41.755,55.688 46.953,60.886 J1.3
NO4: J1.4 K4.2
NO5: J1.5 K5.2 | length 50.5
  Bottom Layer w3: K5.2 47.493,23.259 47.493,49.289 51.469,53.266 J1.5
NO6: J1.6 K6.2 | length 59.9
  Bottom Layer w3: K6.2 53.946,13.406 53.946,46.542 56.86,49.456 J1.6
"RELAY 1": C1.1 K1.1 U1.16 | length 41.2
  Top Layer w0.762: U1.16 18.891,52.29 19.824,53.224 19.824,81.839 20.733,82.748 23.989,82.748 K1.1
"RELAY 2": C2.1 K2.1 U1.15 | length 25.9
  Top Layer w0.762: U1.15 20.351,51.02 21.517,52.186 21.517,65.41 22.548,66.441 C2.1 K2.1
"RELAY 3": C3.1 K3.1 U1.14 | length 11.8
  Top Layer w0.762: U1.14 23.808,49.75 C3.1@24.237,50.18 ; C3.1 K3.1
"RELAY 4": C4.1 K4.1 U1.13 | length 25.4
  Top Layer w0.762: U1.13 20.942,48.48 22.047,47.375 22.047,34.569 22.789,33.827 C4.1 K4.1
"RELAY 5": C5.1 K5.1 U1.12 | length 40.4
  Top Layer w0.762: U1.12 19.882,47.21 20.799,46.294 20.799,18.516 21.794,17.52 C5.1 K5.1
"RELAY 6": C6.1 K6.1 U1.11 | length 55.5
  Top Layer w0.762: U1.11 18.681,45.94 19.381,45.24 19.381,2.23 20.397,1.214 C6.1 K6.1
VCC_5V: J3.1
pads on no net: U1.7 U1.10

## Polygon pours and split planes (outlines as drawn)
GND on Bottom Layer "NONET_L-01_P-001" (solid, pour order 5): 0.919,-3.16 cw(c0.919,1.34) -3.581,1.34 -3.581,94.077 cw(c0.919,94.077) 0.919,98.577 65.731,98.577 cw(c65.731,94.077) 70.231,94.077 70.231,1.325 cw(c65.731,1.325) 65.731,-3.174
5V_EXT on Bottom Layer "NONET_L-01_P-001" (solid, pour order 0): 0.127,23.444 14.58,23.444 14.58,11.76 22.403,11.76 22.403,96.266 14.58,96.266 14.58,41.148 5.452,41.148 5.452,44.581 0.126,44.581 0.117,44.59 0.117,38.745 0.127,38.735
GND on Top Layer "NONET_L-01_P-001" (solid, pour order 4): 0.919,-3.16 cw(c0.919,1.34) -3.581,1.34 -3.581,94.077 cw(c0.919,94.077) 0.919,98.577 65.731,98.577 cw(c65.731,94.077) 70.231,94.077 70.231,1.325 cw(c65.731,1.325) 65.731,-3.174

## Other copper
Top Layer:
  rectangle net AC+: 49.963,5.74 55.455,23.315
  rectangle net NO4: 49.962,32.344 55.454,58.674
  rectangle net NO2: 40.358,64.922 55.454,68.25
  rectangle net NO2: 43.831,63.193 63.692,66.241
  rectangle net AC+: 34.777,70.891 55.454,73.939
  rectangle net AC+: 49.962,70.891 55.454,82.601
  region net AC+: 63.678,82.601 49.962,82.601 49.962,79.553 63.678,79.553
  region net AC+: 55.455,8.788 34.914,8.788 34.914,5.74 55.455,5.74
  rectangle net AC+: 49.963,20.267 63.603,23.315
  rectangle net NO4: 40.332,32.344 55.454,35.455
  rectangle net NO4: 49.962,55.626 63.602,58.674
  rectangle net 5V_EXT: 16.165,41.783 18.324,43.69
  rectangle net AC-: 60.841,32.723 68.859,39.457
  rectangle net AC+: 60.86,20.215 63.807,31.936
  rectangle net GND: 11.227,41.783 13.64,43.69
  pour cut-out: 1.545,71.058 1.545,75.913 6.765,75.913 6.765,71.058
  pour cut-out: 1.545,19.825 1.545,24.679 6.765,24.679 6.765,19.825
  pour cut-out: 26.185,-0.942 26.185,96.192 70.461,96.192 70.461,-0.942
Bottom Layer:
  rectangle net GND: 60.891,12.842 69.164,15.338
  rectangle net GND: 60.891,72.125 69.164,74.622
  rectangle net 5V_EXT: 14.58,92.147 31.013,96.266
  rectangle net 5V_EXT: 14.58,76.225 31.013,80.366
  rectangle net 5V_EXT: 14.58,59.919 31.013,64.059
  rectangle net 5V_EXT: 14.58,11.76 31.013,14.732
  rectangle net 5V_EXT: 14.58,28.067 31.013,31.039
  rectangle net 5V_EXT: 14.58,43.612 31.013,47.752
  rectangle net GND: 60.883,40.622 69.104,46.887
  pour cut-out: 59.052,-0.33 66.037,6.655 66.037,90.094 41.808,90.094 41.808,-0.33
  pour cut-out: 22.631,-1.448 22.631,96.291 52.908,96.291 52.908,-1.448

## Silkscreen, mask and mechanical layers (free items; w line width, h text height)
Top Overlay:
  text "POWER" at 8.839,96.291 h3
  text "RELAY 4" at -3.457,74.498 h1.02
  text "RELAY 2" at -3.457,72.825 h1.02
  text "RELAY 3" at -3.457,71.152 h1.02
  text "RELAY 4" at -3.457,23.265 h1.02
  text "RELAY 5" at -3.457,21.592 h1.02
  text "RELAY 6" at -3.457,19.918 h1.02
Bottom Overlay:
  text "Rev-v1.1" at 22.747,95.577 h2
Board Outline:
  drawing of 177 lines, arcs and shapes, not listed
Fabrication:
  drawing of 191 lines, arcs and shapes, not listed
  text "Layer" at 91.681,113.64 h1.52
  text "Name" at 102.093,113.64 h1.52
  text "Material" at 125.709,113.64 h1.52
  text "Thickness" at 147.547,113.64 h1.52
  text "Constant" at 164.052,113.64 h1.52
  text "Board Layer Stack" at 178.527,113.64 h1.52
  text "Top Overlay" at 102.093,110.592 h1.52
  text "Top Solder" at 102.093,107.544 h1.52
  text "Solder Resist" at 125.709,107.544 h1.52
  text "3.00mil" at 147.547,107.544 h1.52
  text "3.5" at 164.052,107.544 h1.52
  text "1" at 91.681,104.496 h1.52
  text "Top Layer" at 102.093,104.496 h1.52
  text "10.00mil" at 147.547,104.496 h1.52
  text "Dielectric 1" at 102.093,101.448 h1.52
  text "FR-4" at 125.709,101.448 h1.52
  text "37.00mil" at 147.547,101.448 h1.52
  text "4.8" at 164.052,101.448 h1.52
  text "2" at 91.681,98.4 h1.52
  text "Bottom Layer" at 102.093,98.4 h1.52
  text "10.00mil" at 147.547,98.4 h1.52
  text "Bottom Solder" at 102.093,95.352 h1.52
  text "Solder Resist" at 125.709,95.352 h1.52
  text "3.00mil" at 147.547,95.352 h1.52
  text "3.5" at 164.052,95.352 h1.52
  text "Bottom Overlay" at 102.093,92.304 h1.52
  text "Total board thickness:" at 91.681,89.256 h1.52
  text "63.00mil" at 147.547,89.256 h1.52
Drill Drawing:
  circle w0.254: c-1.483,133.625 r0.847
  lines w0.254: -2.329,125.158 -0.636,125.158 -0.636,126.852 -2.329,126.852 -2.329,125.158 ; -2.329,129.815 -1.483,128.968 -0.636,129.815 -1.483,130.662 -2.329,129.815 ; -2.329,136.588 -1.483,137.012 -0.636,136.588 -1.059,137.435 -0.636,138.282 -1.483,137.858 -2.329,138.282 -1.906,137.435 -2.329,136.588 ; -2.329,142.092 -0.636,142.092 -1.483,140.398 -2.329,142.092 ; -2.329,144.632 -1.906,144.632 -1.906,144.208 -1.059,144.208 -1.059,144.632 -0.636,144.632 -0.636,145.478 -1.059,145.478 -1.059,145.902 -1.906,145.902 -1.906,145.478 -2.329,145.478 -2.329,144.632 ; -2.329,148.442 -1.906,148.442 -1.483,148.018 -1.059,148.442 -0.636,148.442 -1.059,148.865 -0.636,149.288 -1.059,149.288 -1.483,149.712 -1.906,149.288 -2.329,149.288 -1.906,148.865 -2.329,148.442
  lines w0.381: -3.848,124.015 337.381,124.015 ; -3.848,150.685 337.381,150.685 ; 10.144,120.205 10.144,154.495 ; 23.857,120.205 23.857,154.495 ; 52.804,120.205 52.804,154.495 ; 65.653,120.205 65.653,154.495 ; 84.292,120.205 84.292,154.495 ; 122.381,120.205 122.381,154.495 ; 137.363,120.205 137.363,154.495 ; 156.306,120.205 156.306,154.495 ; 190.332,120.205 190.332,154.495 ; 212.017,120.205 212.017,154.495 ; 245.891,120.205 245.891,154.495 ; 279.765,120.205 279.765,154.495 ; 301.755,120.205 301.755,154.495 ; -3.848,120.205 337.381,120.205 337.381,154.495 -3.848,154.495 -3.848,120.205
  text "Symbol" at -1.562,151.828 h1.83
  text "Count" at 11.287,151.828 h1.83
  text "Hole Size" at 25,151.828 h1.83
  text "Plated" at 53.947,151.828 h1.83
  text "Hole Type" at 66.796,151.828 h1.83
  text "Drill Layer Pair" at 85.435,151.828 h1.83
  text "Via/Pad" at 123.524,151.828 h1.83
  text "Pad Shape" at 138.506,151.828 h1.83
  text "Template" at 157.449,151.828 h1.83
  text "Description" at 191.475,151.828 h1.83
  text "Hole Tolerance (+)" at 213.16,151.828 h1.83
  text "Hole Tolerance (-)" at 247.034,151.828 h1.83
  text "Hole Length" at 280.908,151.828 h1.83
  text "Routed Path Length" at 302.898,151.828 h1.83
  text "2" at 11.287,148.018 h1.52
  text "122.05mil (3.100mm)" at 25,148.018 h1.52
  text "PTH" at 53.947,148.018 h1.52
  text "Round" at 66.796,148.018 h1.52
  text "Top Layer - Bottom Layer" at 85.435,148.018 h1.52
  text "Pad" at 123.524,148.018 h1.52
  text "Rounded" at 138.506,148.018 h1.52
  text "c412h310" at 157.449,148.018 h1.52
  text "-" at 280.908,148.018 h1.52
  text "-" at 302.898,148.018 h1.52
  text "4" at 11.287,144.208 h1.52
  text "118.11mil (3.000mm)" at 25,144.208 h1.52
  text "NPTH" at 53.947,144.208 h1.52
  text "Round" at 66.796,144.208 h1.52
  text "Top Layer - Bottom Layer" at 85.435,144.208 h1.52
  text "Pad" at 123.524,144.208 h1.52
  text "Rounded" at 138.506,144.208 h1.52
  text "c300hn300p300" at 157.449,144.208 h1.52
  text "-" at 280.908,144.208 h1.52
  text "-" at 302.898,144.208 h1.52
  text "6" at 11.287,140.398 h1.52
  text "59.06mil (1.500mm)" at 25,140.398 h1.52
  text "PTH" at 53.947,140.398 h1.52
  text "Round" at 66.796,140.398 h1.52
  text "Top Layer - Bottom Layer" at 85.435,140.398 h1.52
  text "Pad" at 123.524,140.398 h1.52
  text "Rounded" at 138.506,140.398 h1.52
  text "c250h150m255mx255p250" at 157.449,140.398 h1.52
  text "-" at 280.908,140.398 h1.52
  text "-" at 302.898,140.398 h1.52
  text "9" at 11.287,136.588 h1.52
  text "41.34mil (1.050mm)" at 25,136.588 h1.52
  text "PTH" at 53.947,136.588 h1.52
  text "Round" at 66.796,136.588 h1.52
  text "Top Layer - Bottom Layer" at 85.435,136.588 h1.52
  text "Pad" at 123.524,136.588 h1.52
  text "Rounded" at 138.506,136.588 h1.52
  text "(Mixed)" at 157.449,136.588 h1.52
  text "-" at 280.908,136.588 h1.52
  text "-" at 302.898,136.588 h1.52
  text "12" at 11.287,132.778 h1.52
  text "62.99mil (1.600mm)" at 25,132.778 h1.52
  text "PTH" at 53.947,132.778 h1.52
  text "Round" at 66.796,132.778 h1.52
  text "Top Layer - Bottom Layer" at 85.435,132.778 h1.52
  text "Pad" at 123.524,132.778 h1.52
  text "(Mixed)" at 138.506,132.778 h1.52
  text "(Mixed)" at 157.449,132.778 h1.52
  text "-" at 280.908,132.778 h1.52
  text "-" at 302.898,132.778 h1.52
  text "27" at 11.287,128.968 h1.52
  text "11.81mil (0.300mm)" at 25,128.968 h1.52
  text "PTH" at 53.947,128.968 h1.52
  text "Round" at 66.796,128.968 h1.52
  text "Top Layer - Bottom Layer" at 85.435,128.968 h1.52
  text "Via" at 123.524,128.968 h1.52
  text "Rounded" at 138.506,128.968 h1.52
  text "v60h30" at 157.449,128.968 h1.52
  text "-" at 280.908,128.968 h1.52
  text "-" at 302.898,128.968 h1.52
  text "30" at 11.287,125.158 h1.52
  text "60.00mil (1.524mm)" at 25,125.158 h1.52
  text "PTH" at 53.947,125.158 h1.52
  text "Round" at 66.796,125.158 h1.52
  text "Top Layer - Bottom Layer" at 85.435,125.158 h1.52
  text "Pad" at 123.524,125.158 h1.52
  text "Rounded" at 138.506,125.158 h1.52
  text "(Mixed)" at 157.449,125.158 h1.52
  text "-" at 280.908,125.158 h1.52
  text "-" at 302.898,125.158 h1.52
  text "90 Total" at 11.287,121.348 h1.52

## Dimensions
0.919,94.077 to 0.919,104.521 on Dimensions
65.731,98.577 to 65.731,-3.174 on Dimensions
-3.581,94.077 to 70.231,94.077 on Dimensions

## Text inside footprints (layer, text, board x,y; h text height)
J3: Top Overlay "1" at 6.838,40.889 h1 r270
K1: Top Overlay "1" at 27.523,82.189 h1
K2: Top Overlay "1" at 27.523,65.882 h1
K3: Top Overlay "1" at 27.523,49.575 h1
K4: Top Overlay "1" at 27.523,33.268 h1
K5: Top Overlay "1" at 27.523,16.962 h1
K6: Top Overlay "1" at 27.523,0.655 h1